# Altium PCB updated_pcb_file.PcbDoc (part 4 of 5)
Units mil, origin at the board's own origin, x right, y up, seen from the top; angles counter-clockwise.
Board outline 3385.83 x 2125.98 mil, 4 copper layers (L1 (TOP), L2 (GND), L3 (PWR), L4 (BOTTOM)), stack 38.228 mil thick; 154 components, 143 nets, 726 pads, 326 vias.
Unrouted connection lines stored in the file: 46.
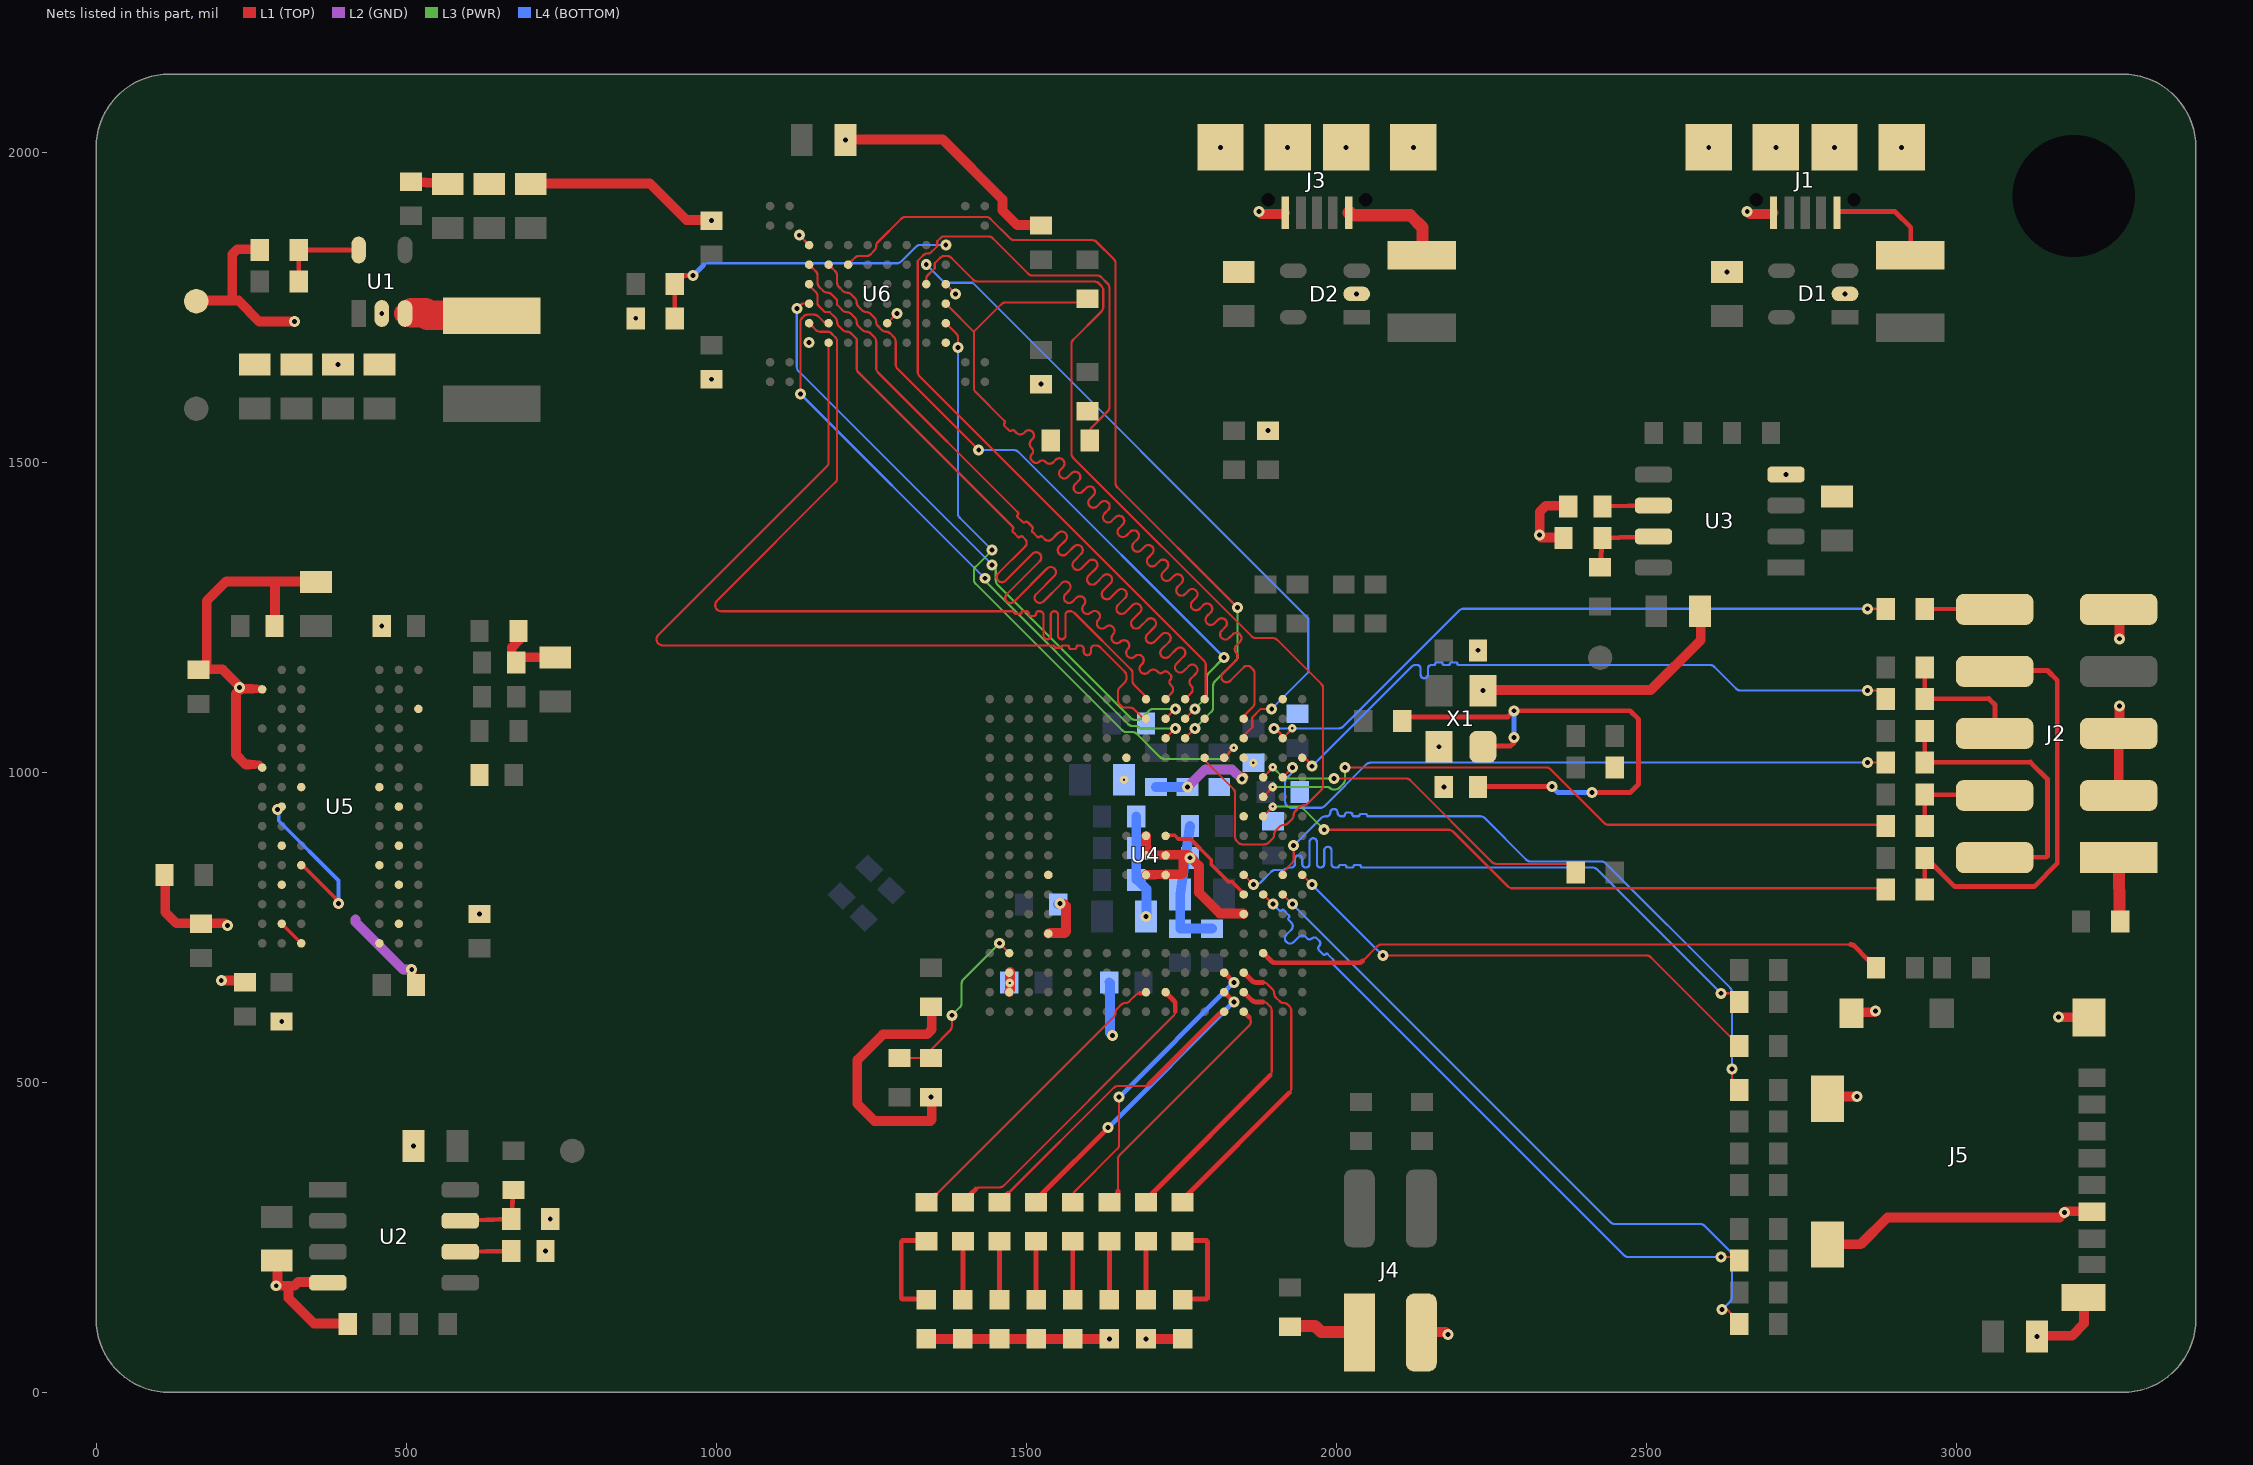
[diagram p6: the nets of this part, all layers, seen from the top]

## Via types
v1: diameter 17.72, hole 7.87, L1 (TOP) to L4 (BOTTOM), 310 vias
v2: diameter 13.78, hole 3.94, L1 (TOP) to L3 (PWR), 7 vias
v3: diameter 17.72, hole 7.87, L1 (TOP) to L3 (PWR), 5 vias
v4: diameter 13.78, hole 3.94, L2 (GND) to L4 (BOTTOM), 3 vias
v5: diameter 13.78, hole 3.94, L3 (PWR) to L4 (BOTTOM), 1 vias

## Nets (pads, with @x,y where several pads share a name; then routed paths per layer and width w, separated by ;. In a path a pad name is that pad's centre, name@x,y a point inside that pad or via, vN(x,y) a via of type N, cw(c..) or ccw(c..) an arc to the next point about the centre after c; other vN are vias at no path point) (continued)
FLASH_CLE: U4.M14 U6.D5 | length 1687
  L1 (TOP) w3.54: U6.D5@1338.58,1787.4 1338.58,1793.31 1338.58,1796.26 cw(c1345.71,1796.26) 1340.67,1801.3 1352.36,1812.99 1352.36,1820.87 1361.29,1829.79 cw(c1368.25,1822.83) 1368.25,1832.68 1371.91,1832.68 cw(c1371.91,1822.83) 1378.87,1829.79 1414.44,1794.22 ; 1414.44,1794.22 ccw(c1421.4,1801.18) 1421.4,1791.34 1610.1,1791.34 cw(c1610.1,1781.5) 1617.06,1788.46 1621.13,1784.38 cw(c1614.17,1777.42) 1624.02,1777.42 1624.02,1750.14 cw(c1614.17,1750.14) 1621.13,1743.18 1575.72,1697.76 ccw(c1582.68,1690.8) 1572.83,1690.8 1572.83,1513.92 ccw(c1582.68,1513.92) 1575.72,1506.96 1863.26,1219.42 ccw(c1870.22,1226.38) 1870.22,1216.54 1897.5,1216.54 cw(c1897.5,1206.69) 1904.46,1213.65 1975.46,1142.65 cw(c1968.5,1135.69) 1978.35,1135.69 1978.35,978.49 cw(c1968.5,978.49) 1975.46,971.53 1953.57,949.63 cw(c1946.85,956.35) 1946.85,946.85 ccw(c1946.85,937.35) 1940.13,944.07 1933.89,937.82 ccw(c1940.61,931.1) 1931.1,931.1 cw(c1921.6,931.1) 1928.32,924.38 1922.07,918.14 cw(c1915.35,924.86) 1915.35,915.35 ccw(c1915.35,905.85) 1908.63,912.57 1902.39,906.33 ccw(c1909.11,899.61) 1899.61,899.61 cw(c1890.1,899.61) 1896.82,892.89 1890.68,886.74 cw(c1883.72,893.7) 1883.72,883.86 1848.56,883.86 cw(c1848.56,893.7) 1841.6,886.74 1839.5,888.85 cw(c1846.46,895.81) 1836.61,895.81 1836.61,966.4 ccw(c1826.77,966.4) 1833.73,973.36 1791.01,1016.07 cw(c1797.97,1023.03) 1788.63,1019.92 U4.M14@1787.4,1023.62
FLASH_CS: R25.1 U4.P16 U6.C6 | length 1671
  L1 (TOP) w3.54: U6.C6@1370.08,1755.91 1374.02,1751.97 1415.35,1710.63 ; R25.1@1598.43,1763.78 1584.35,1758.5 cw(c1580.89,1767.72) 1580.89,1757.87 1466.67,1757.87 ccw(c1466.67,1748.03) 1459.71,1754.99 1415.35,1710.63 ; 1826.77,1216.54 cw(c1820.87,1222.44) 1814.96,1216.54 cw(c1820.87,1222.44) 1814.96,1228.35 1820.87,1234.25 ccw(c1814.96,1240.16) 1820.87,1246.06 ccw(c1814.96,1240.16) 1809.05,1246.06 1803.15,1240.16 cw(c1797.24,1246.06) 1791.34,1240.16 cw(c1797.24,1246.06) 1791.34,1251.97 1797.24,1257.87 ccw(c1791.34,1263.78) 1797.24,1269.68 ccw(c1791.34,1263.78) 1785.43,1269.68 1779.53,1263.78 cw(c1773.62,1269.68) 1767.72,1263.78 cw(c1773.62,1269.68) 1767.72,1275.59 1773.62,1281.5 ccw(c1767.72,1287.4) 1773.62,1293.31 ccw(c1767.72,1287.4) 1761.81,1293.31 1755.9,1287.4 cw(c1750,1293.31) 1744.09,1287.4 cw(c1750,1293.31) 1744.09,1299.21 1750,1305.12 ccw(c1744.09,1311.02) 1750,1316.93 ccw(c1744.09,1311.02) 1738.19,1316.93 1732.28,1311.02 cw(c1726.38,1316.93) 1720.47,1311.02 cw(c1726.38,1316.93) 1720.47,1322.83 1726.38,1328.74 ccw(c1720.47,1334.65) 1726.38,1340.55 ccw(c1720.47,1334.65) 1714.57,1340.55 1708.66,1334.65 cw(c1702.76,1340.55) 1696.85,1334.65 cw(c1702.76,1340.55) 1696.85,1346.46 1702.76,1352.36 ccw(c1696.85,1358.27) 1702.76,1364.17 ccw(c1696.85,1358.27) 1690.94,1364.17 1685.04,1358.27 cw(c1679.13,1364.17) 1673.23,1358.27 cw(c1679.13,1364.17) 1673.23,1370.08 1679.13,1375.98 ccw(c1673.23,1381.89) 1679.13,1387.8 ccw(c1673.23,1381.89) 1667.32,1387.8 1661.42,1381.89 cw(c1655.51,1387.79) 1649.61,1381.89 cw(c1655.51,1387.79) 1649.61,1393.7 1655.51,1399.61 ccw(c1649.61,1405.51) 1655.51,1411.42 ccw(c1649.61,1405.51) 1643.7,1411.42 1637.79,1405.51 cw(c1631.89,1411.42) 1625.98,1405.51 cw(c1631.89,1411.42) 1625.98,1417.32 1631.89,1423.23 ccw(c1625.98,1429.13) 1631.89,1435.04 ccw(c1625.98,1429.13) 1620.08,1435.04 1614.17,1429.13 cw(c1608.27,1435.04) 1602.36,1429.13 cw(c1608.27,1435.04) 1602.36,1440.94 1608.27,1446.85 ccw(c1602.36,1452.76) 1608.27,1458.66 ccw(c1602.36,1452.76) 1596.46,1458.66 1590.55,1452.76 cw(c1584.65,1458.66) 1578.74,1452.76 cw(c1584.65,1458.66) 1578.74,1464.57 1584.65,1470.47 ccw(c1578.74,1476.38) 1584.65,1482.28 ccw(c1578.74,1476.38) 1572.83,1482.28 1566.93,1476.38 cw(c1561.02,1482.28) 1555.12,1476.38 cw(c1561.02,1482.28) 1555.12,1488.19 1559.05,1492.13 ccw(c1553.15,1498.03) 1559.05,1503.94 ccw(c1553.15,1498.03) 1547.24,1503.94 1543.31,1500 cw(c1537.4,1505.91) 1531.5,1500 1530.51,1500.98 ccw(c1525.59,1496.06) 1520.67,1500.98 cw(c1515.75,1505.91) 1510.83,1500.98 1508.86,1502.95 cw(c1513.78,1507.87) 1508.86,1512.8 ccw(c1503.94,1517.72) 1508.86,1522.64 1507.87,1523.62 cw(c1513.78,1529.53) 1507.87,1535.43 1509.84,1537.4 ccw(c1503.94,1543.31) 1509.84,1549.21 ccw(c1503.94,1543.31) 1498.03,1549.21 1496.06,1547.24 cw(c1490.16,1553.15) 1484.25,1547.24 1480.31,1551.18 ccw(c1478.35,1549.21) 1476.38,1551.18 cw(c1474.41,1553.15) 1472.44,1551.18 1464.57,1559.05 cw(c1466.53,1561.02) 1464.57,1562.99 ccw(c1462.6,1564.96) 1464.57,1566.93 1418.24,1613.26 cw(c1425.2,1620.22) 1415.35,1620.22 1415.35,1710.63 ; 1826.77,1216.54 1832.68,1222.44 cw(c1838.58,1216.54) 1844.49,1222.44 cw(c1838.58,1216.54) 1844.49,1210.63 1838.58,1204.72 ccw(c1844.49,1198.82) 1838.58,1192.91 cw(c1832.68,1187.01) 1838.58,1181.1 1816.93,1159.45 ccw(c1822.83,1153.54) 1816.93,1147.64 ccw(c1822.83,1153.54) 1828.74,1147.64 1850.39,1169.29 cw(c1856.3,1163.39) 1862.2,1169.29 1865.23,1166.27 cw(c1858.27,1159.31) 1868.11,1159.31 1868.11,1112.34 cw(c1858.27,1112.34) 1865.23,1105.38 1854,1094.16 ccw(c1860.97,1087.2) 1851.63,1090.31 U4.P16@1850.39,1086.61
FLASH_D0: U4.L15 U6.H4 | length 1377.7
  L1 (TOP) w3.54: U6.H4@1212.6,1818.9 1216.53,1822.83 1223.49,1829.79 cw(c1230.45,1822.83) 1230.45,1832.68 1241.99,1832.68 ccw(c1241.99,1842.52) 1248.95,1835.56 1255.09,1841.7 ccw(c1248.37,1848.42) 1257.87,1848.42 cw(c1267.38,1848.42) 1260.66,1855.15 1298.3,1892.79 cw(c1305.26,1885.83) 1305.26,1895.67 1434.9,1895.67 cw(c1434.9,1885.83) 1441.86,1892.79 1473.49,1861.15 ccw(c1480.45,1868.11) 1480.45,1858.27 1606.16,1858.27 cw(c1606.16,1848.42) 1613.12,1855.38 1640.82,1827.69 cw(c1633.86,1820.73) 1643.7,1820.73 1643.7,1466.68 ccw(c1653.54,1466.68) 1646.58,1459.72 v1(1840.55,1265.75) ; U4.L15@1755.9,1055.12 v1(1771.65,1070.87)
  L3 (PWR) w3.54: v1(1771.65,1070.87) 1798.3,1097.51 ccw(c1791.34,1104.47) 1801.18,1104.47 1801.18,1139.62 cw(c1811.02,1139.62) 1804.06,1146.58 1837.67,1180.19 ccw(c1830.71,1187.15) 1840.55,1187.15 v1(1840.55,1265.75)
FLASH_D1: U4.L16 U6.J4 | length 1065.1
  L1 (TOP) w3.54: U6.J4@1181.1,1818.9 1185.04,1814.96 1192,1808 cw(c1185.04,1801.04) 1194.88,1801.04 1194.88,1789.51 ccw(c1204.72,1789.51) 1197.76,1782.55 1203.91,1776.41 ccw(c1210.63,1783.13) 1210.63,1773.62 cw(c1210.63,1764.12) 1217.35,1770.84 1223.59,1764.59 cw(c1216.87,1757.87) 1226.38,1757.87 ccw(c1235.88,1757.87) 1229.16,1751.15 1235.4,1744.91 ccw(c1242.13,1751.63) 1242.13,1742.13 cw(c1242.13,1732.62) 1248.85,1739.34 1255.09,1733.1 cw(c1248.37,1726.38) 1257.87,1726.38 ccw(c1267.38,1726.38) 1260.66,1719.66 1266.9,1713.41 ccw(c1273.62,1720.13) 1273.62,1710.63 cw(c1273.62,1701.12) 1280.34,1707.85 1286.49,1701.7 cw(c1279.53,1694.74) 1289.37,1694.74 1289.37,1657.62 ccw(c1299.21,1657.62) 1292.25,1650.66 v1(1423.23,1519.68) ; U4.L16@1755.9,1086.61 v1(1771.65,1102.36)
  L3 (PWR) w3.54: v1(1771.65,1102.36) 1788.46,1119.16 ccw(c1781.5,1126.12) 1791.34,1126.12 1791.34,1153.4 cw(c1801.18,1153.4) 1794.22,1160.36 v1(1818.9,1185.04)
  L4 (BOTTOM) w3.54: v1(1423.23,1519.68) 1480.17,1519.68 cw(c1480.17,1509.84) 1487.13,1516.8 v1(1818.9,1185.04)
FLASH_D2: U4.L17 U6.K4 | length 1491
  L1 (TOP) w3.54: U6.K4@1149.61,1818.9 1153.54,1814.96 1160.5,1808 cw(c1153.54,1801.04) 1163.39,1801.04 1163.39,1789.51 ccw(c1173.23,1789.51) 1166.27,1782.55 1172.41,1776.41 ccw(c1179.13,1783.13) 1179.13,1773.62 cw(c1179.13,1764.12) 1185.85,1770.84 1194.88,1761.81 1194.88,1753.94 1203.91,1744.91 ccw(c1210.63,1751.63) 1210.63,1742.13 cw(c1210.63,1732.62) 1217.35,1739.34 1223.59,1733.1 cw(c1216.87,1726.38) 1226.38,1726.38 ccw(c1235.88,1726.38) 1229.16,1719.66 1235.4,1713.41 ccw(c1242.13,1720.13) 1242.13,1710.63 cw(c1242.13,1701.12) 1248.85,1707.85 1254.99,1701.7 cw(c1248.03,1694.74) 1257.87,1694.74 1257.87,1651.71 ccw(c1267.72,1651.71) 1260.76,1644.75 1486.22,1419.29 cw(c1484.25,1417.32) 1486.22,1415.35 ccw(c1488.19,1413.39) 1486.22,1411.42 1494.09,1403.54 ccw(c1496.06,1405.51) 1498.03,1403.54 cw(c1500,1401.57) 1501.97,1403.54 1509.84,1395.67 cw(c1507.87,1393.7) 1509.84,1391.73 ccw(c1511.81,1389.76) 1509.84,1387.79 1517.72,1379.92 ccw(c1519.68,1381.89) 1521.65,1379.92 cw(c1523.62,1377.95) 1525.59,1379.92 1529.53,1375.98 ccw(c1535.43,1381.89) 1541.34,1375.98 1551.18,1385.83 cw(c1557.09,1379.92) 1562.99,1385.83 cw(c1557.09,1379.92) 1562.99,1374.02 1553.15,1364.17 ccw(c1559.05,1358.27) 1553.15,1352.36 ccw(c1559.05,1358.27) 1564.96,1352.36 1576.77,1364.17 ; 1576.77,1340.55 ccw(c1582.68,1334.65) 1576.77,1328.74 ccw(c1582.68,1334.65) 1588.58,1328.74 1600.39,1340.55 cw(c1606.3,1334.65) 1612.2,1340.55 cw(c1606.3,1334.65) 1612.2,1328.74 1600.39,1316.93 ccw(c1606.3,1311.02) 1600.39,1305.12 ccw(c1606.3,1311.02) 1612.2,1305.12 1624.02,1316.93 cw(c1629.92,1311.02) 1635.83,1316.93 cw(c1629.92,1311.02) 1635.83,1305.12 1624.02,1293.31 ccw(c1629.92,1287.4) 1624.02,1281.5 ccw(c1629.92,1287.4) 1635.83,1281.5 1647.64,1293.31 cw(c1653.54,1287.4) 1659.45,1293.31 cw(c1653.54,1287.4) 1659.45,1281.5 1647.64,1269.68 ccw(c1653.54,1263.78) 1647.64,1257.87 ccw(c1653.54,1263.78) 1659.45,1257.87 1671.26,1269.68 cw(c1677.16,1263.78) 1683.07,1269.68 cw(c1677.16,1263.78) 1683.07,1257.87 1671.26,1246.06 ccw(c1677.16,1240.16) 1671.26,1234.25 ccw(c1677.16,1240.16) 1683.07,1234.25 1694.88,1246.06 cw(c1700.79,1240.16) 1706.69,1246.06 cw(c1700.79,1240.16) 1706.69,1234.25 1694.88,1222.44 ccw(c1700.79,1216.54) 1694.88,1210.63 ccw(c1700.79,1216.54) 1706.69,1210.63 1718.5,1222.44 cw(c1724.41,1216.54) 1730.31,1222.44 cw(c1724.41,1216.54) 1730.31,1210.63 1718.5,1198.82 ccw(c1724.41,1192.91) 1718.5,1187.01 ccw(c1724.41,1192.91) 1730.31,1187.01 1742.13,1198.82 cw(c1748.03,1192.91) 1753.94,1198.82 cw(c1748.03,1192.91) 1753.94,1187.01 1742.13,1175.2 ccw(c1748.03,1169.29) 1742.13,1163.39 ccw(c1748.03,1169.29) 1753.94,1163.39 1761.81,1171.26 cw(c1767.72,1165.35) 1773.62,1171.26 cw(c1767.72,1165.35) 1773.62,1159.45 1765.75,1151.57 ccw(c1771.65,1145.67) 1765.75,1139.76 cw(c1759.84,1133.86) 1765.75,1127.95 U4.L17@1755.9,1118.11 ; 1576.77,1364.17 cw(c1582.68,1358.27) 1588.58,1364.17 cw(c1582.68,1358.27) 1588.58,1352.36 1576.77,1340.55
FLASH_D3: U4.K17 U6.K5 | length 1492.3
  L1 (TOP) w3.54: U6.K5@1149.61,1787.4 1150.86,1784.89 ccw(c1159.66,1789.29) 1152.7,1782.33 1160.5,1774.54 cw(c1153.54,1767.58) 1163.39,1767.58 1163.39,1755.98 ccw(c1168.31,1755.98) 1164.83,1752.5 1175.2,1742.13 1183.07,1742.13 1192.1,1733.1 cw(c1185.38,1726.38) 1194.88,1726.38 ccw(c1204.39,1726.38) 1197.67,1719.66 1203.91,1713.41 ccw(c1210.63,1720.13) 1210.63,1710.63 cw(c1210.63,1701.12) 1217.35,1707.85 1226.38,1698.82 1226.38,1651.71 ccw(c1236.22,1651.71) 1229.26,1644.75 1478.35,1395.67 cw(c1476.38,1393.7) 1478.35,1391.73 ccw(c1480.31,1389.76) 1478.35,1387.79 1486.22,1379.92 ccw(c1488.19,1381.89) 1490.16,1379.92 cw(c1492.13,1377.95) 1494.09,1379.92 1498.03,1375.98 cw(c1492.13,1370.08) 1498.03,1364.17 1454.72,1320.87 ccw(c1460.63,1314.96) 1454.72,1309.05 ccw(c1460.63,1314.96) 1466.53,1309.05 1509.84,1352.36 cw(c1515.75,1346.46) 1521.65,1352.36 cw(c1515.75,1346.46) 1521.65,1340.55 1468.5,1287.4 ccw(c1474.41,1281.5) 1468.5,1275.59 ccw(c1474.41,1281.5) 1480.31,1275.59 1533.46,1328.74 cw(c1539.37,1322.83) 1545.28,1328.74 cw(c1539.37,1322.83) 1545.28,1316.93 1515.75,1287.4 ccw(c1521.65,1281.5) 1515.75,1275.59 ccw(c1521.65,1281.5) 1527.56,1275.59 1557.09,1305.12 cw(c1562.99,1299.21) 1568.9,1305.12 cw(c1562.99,1299.21) 1568.9,1293.31 1562.99,1287.4 ccw(c1568.9,1281.5) 1562.99,1275.59 ccw(c1568.9,1281.5) 1574.8,1275.59 1580.71,1281.5 cw(c1586.61,1275.59) 1592.52,1281.5 cw(c1586.61,1275.59) 1592.52,1269.68 ccw(c1598.42,1263.78) 1592.52,1257.87 ccw(c1598.42,1263.78) 1604.33,1257.87 cw(c1610.24,1251.97) 1616.14,1257.87 cw(c1610.24,1251.97) 1616.14,1246.06 ccw(c1622.05,1240.16) 1616.14,1234.25 ccw(c1622.05,1240.16) 1627.95,1234.25 cw(c1633.86,1228.35) 1639.76,1234.25 cw(c1633.86,1228.35) 1639.76,1222.44 ccw(c1645.67,1216.54) 1639.76,1210.63 ccw(c1645.67,1216.54) 1651.57,1210.63 cw(c1657.48,1204.72) 1663.39,1210.63 cw(c1657.48,1204.72) 1663.39,1198.82 ccw(c1669.29,1192.91) 1663.39,1187.01 ccw(c1669.29,1192.91) 1675.2,1187.01 cw(c1681.1,1181.1) 1687.01,1187.01 cw(c1681.1,1181.1) 1687.01,1175.2 1685.04,1173.23 ccw(c1690.94,1167.32) 1685.04,1161.42 ccw(c1690.94,1167.32) 1696.85,1161.42 1698.82,1163.39 cw(c1704.72,1157.48) 1710.63,1163.39 1712.6,1161.42 ccw(c1716.53,1165.35) 1720.47,1161.42 cw(c1724.41,1157.48) 1728.35,1161.42 1732.28,1157.48 cw(c1728.35,1153.54) 1732.28,1149.61 ccw(c1736.22,1145.67) 1732.28,1141.73 1734.25,1139.76 cw(c1728.35,1133.86) 1734.25,1127.95 U4.K17@1724.41,1118.11
FLASH_D4: U4.K16 U6.K6 | length 1006.2
  L1 (TOP) w3.54: v1(1129.92,1748.03) 1135.71,1753.82 cw(c1140.75,1748.78) 1140.75,1755.91 1143.7,1755.91 U6.K6@1149.61,1755.91 ; U4.K16@1724.41,1086.61 v1(1740.16,1102.36)
  L3 (PWR) w3.54: v1(1444.88,1334.65) 1447.9,1331.62 cw(c1440.94,1324.66) 1450.79,1324.66 1450.79,1309.19 ccw(c1460.63,1309.19) 1453.67,1302.24 1668.38,1087.53 ccw(c1675.34,1094.49) 1675.34,1084.65 1678.99,1084.65 ccw(c1678.99,1094.49) 1685.95,1087.53 1697.9,1099.48 cw(c1704.86,1092.52) 1704.86,1102.36 v1(1740.16,1102.36)
  L4 (BOTTOM) w3.54: v1(1129.92,1748.03) 1129.92,1653.68 ccw(c1139.76,1653.68) 1132.8,1646.72 v1(1444.88,1334.65)
FLASH_D5: U4.K15 U6.J7 | length 1023.9
  L1 (TOP) w3.54: v1(1135.83,1610.24) 1135.83,1726.24 cw(c1145.67,1726.24) 1138.71,1733.2 1140.82,1735.31 cw(c1147.78,1728.35) 1147.78,1738.19 1157.34,1738.19 cw(c1157.34,1728.35) 1164.3,1735.31 1173.11,1726.5 ccw(c1178.15,1731.54) 1178.15,1724.41 U6.J7@1181.1,1724.41 ; U4.K15@1724.41,1055.12 v1(1740.16,1070.87)
  L3 (PWR) w3.54: v1(1433.07,1312.99) 1433.07,1311.02 ccw(c1437.82,1311.02) 1434.46,1307.66 1664.44,1077.69 ccw(c1671.4,1084.65) 1671.4,1074.8 1676.35,1074.8 cw(c1676.35,1068.08) 1681.1,1072.83 ccw(c1685.85,1077.59) 1685.85,1070.87 v1(1740.16,1070.87)
  L4 (BOTTOM) w3.54: v1(1135.83,1610.24) v1(1433.07,1312.99)
FLASH_D6: U4.J17 U6.K7 | length 1509.7
  L1 (TOP) w3.54: U6.K7@1149.61,1724.41 1153.54,1720.47 1160.5,1713.51 ccw(c1167.46,1720.47) 1167.46,1710.63 1178.99,1710.63 cw(c1178.99,1700.79) 1185.95,1707.75 1192,1701.7 cw(c1185.04,1694.74) 1194.88,1694.74 1194.88,1474.55 cw(c1185.04,1474.55) 1192,1467.59 1001.05,1276.64 ccw(c1008.01,1269.68) 1008.01,1259.84 1478.35,1259.84 cw(c1478.35,1257.87) 1480.31,1257.87 ccw(c1482.28,1257.87) 1482.28,1255.91 1490.16,1255.91 ccw(c1490.16,1257.87) 1492.13,1257.87 cw(c1494.09,1257.87) 1494.09,1259.84 1500,1259.84 cw(c1500,1255.91) 1503.94,1255.91 ccw(c1507.87,1255.91) 1507.87,1251.97 1511.81,1251.97 ccw(c1511.81,1255.91) 1515.75,1255.91 cw(c1519.68,1255.91) 1519.68,1259.84 1521.65,1259.84 cw(c1521.65,1253.94) 1527.56,1253.94 1527.56,1220.47 ccw(c1533.46,1220.47) 1533.46,1214.57 ccw(c1533.46,1220.47) 1539.37,1220.47 1539.37,1253.94 cw(c1545.27,1253.94) 1545.27,1259.84 cw(c1545.27,1253.94) 1551.18,1253.94 1551.18,1220.47 ccw(c1557.09,1220.47) 1557.09,1214.57 ccw(c1557.09,1220.47) 1562.99,1220.47 1562.99,1253.94 cw(c1568.9,1253.94) 1568.9,1259.84 1570.73,1259.84 cw(c1570.73,1250) 1577.69,1256.96 1668.38,1166.27 cw(c1661.42,1159.31) 1671.26,1159.31 1671.26,1147.78 ccw(c1681.1,1147.78) 1674.14,1140.82 1689.3,1125.66 cw(c1682.34,1118.7) 1691.68,1121.81 U4.J17@1692.91,1118.11
FLASH_D7: U4.J16 U6.J8 | length 1512.4
  L1 (TOP) w3.54: U6.J8@1181.1,1692.91 1181.1,1687.01 1181.1,1500.14 cw(c1171.26,1500.14) 1178.22,1493.18 906.57,1221.53 ccw(c913.53,1214.57) 913.53,1204.72 1543.31,1204.72 cw(c1543.31,1202.76) 1545.27,1202.76 ccw(c1547.24,1202.76) 1547.24,1200.79 1555.12,1200.79 ccw(c1555.12,1202.76) 1557.09,1202.76 cw(c1559.05,1202.76) 1559.05,1204.72 1565.94,1204.72 cw(c1565.94,1201.77) 1568.9,1201.77 ccw(c1571.85,1201.77) 1571.85,1198.82 1577.76,1198.82 ccw(c1577.76,1201.77) 1580.71,1201.77 cw(c1583.66,1201.77) 1583.66,1204.72 1586.61,1204.72 cw(c1586.61,1198.82) 1592.52,1198.82 1592.52,1194.88 ccw(c1598.42,1194.88) 1598.42,1188.98 ccw(c1598.42,1194.88) 1604.33,1194.88 1604.33,1198.82 cw(c1610.24,1198.82) 1610.24,1204.72 1612.06,1204.72 cw(c1612.06,1194.88) 1619.02,1201.84 1658.53,1162.33 cw(c1651.57,1155.37) 1661.42,1155.37 1661.42,1151.71 cw(c1651.57,1151.71) 1658.53,1144.75 1650.52,1136.74 ccw(c1657.48,1129.78) 1647.64,1129.78 1647.64,1116.28 ccw(c1657.48,1116.28) 1650.52,1109.32 1652.63,1107.21 ccw(c1659.59,1114.17) 1659.59,1104.33 1667.18,1104.33 cw(c1667.18,1094.49) 1674.14,1101.45 1685.36,1090.23 ccw(c1692.32,1097.19) 1689.21,1087.85 U4.J16@1692.91,1086.61
FLASH_OE: U4.P15 U6.D4 | length 1098.6
  L1 (TOP) w3.54: U4.P15@1850.39,1055.12 1852.36,1061.02 1864.17,1072.83 1864.17,1088.58 1877.95,1102.36 v1(1895.67,1102.36)
  L4 (BOTTOM) w3.54: v1(1338.58,1818.9) 1368.11,1789.37 1413.39,1789.37 1954.72,1248.03 1954.72,1161.42 v1(1895.67,1102.36)
FLASH_R_RDY: R28.2 U6.C8
FLASH_RDY: R26.1 R28.1 U4.M17 | length 1544.6
  L1 (TOP) w3.54: R26.1@1598.43,1582.68 1614.17,1568.9 1616.14,1566.93 ; R28.1@1602.36,1535.43 1602.36,1549.07 cw(c1612.2,1549.07) 1605.24,1556.03 1630.97,1581.76 ccw(c1624.02,1588.72) 1633.86,1588.72 1633.86,1781.36 ccw(c1624.02,1781.36) 1630.97,1788.32 1620.99,1798.3 ccw(c1614.03,1791.34) 1614.03,1801.18 1509.98,1801.18 cw(c1509.98,1811.02) 1503.02,1804.06 1445.8,1861.29 ccw(c1438.84,1854.33) 1438.84,1864.17 1364.17,1864.17 1356.3,1856.3 1356.3,1848.42 1347.27,1839.4 cw(c1340.55,1846.12) 1340.55,1836.61 ccw(c1340.55,1827.11) 1333.83,1833.83 1324.8,1824.8 1324.8,1645.81 ccw(c1334.65,1645.81) 1327.69,1638.85 1786.49,1180.05 cw(c1779.53,1173.09) 1789.37,1173.09 1789.37,1125.61 cw(c1779.53,1125.61) 1788.86,1122.5 U4.M17@1787.4,1118.11
FLASH_WE: U4.N14 U6.C7 | length 1024.3
  L1 (TOP) w3.54: U6.C7@1370.08,1724.41 1374.02,1720.47 1386.88,1707.61 cw(c1379.92,1700.65) 1389.76,1700.65 v1(1389.76,1685.04) ; U4.N14@1818.9,1023.62 v2(1834.65,1039.37)
  L3 (PWR) w3.54: v1(1444.88,1358.27) 1418.24,1331.62 ccw(c1425.2,1324.66) 1415.35,1324.66 1415.35,1311.16 ccw(c1425.2,1311.16) 1418.24,1304.2 1654.6,1067.84 ccw(c1661.56,1074.8) 1661.56,1064.96 1671.12,1064.96 cw(c1671.12,1055.12) 1678.08,1062.08 1715.62,1024.54 ccw(c1722.58,1031.5) 1722.58,1021.65 1812.85,1021.65 ccw(c1812.85,1031.5) 1819.81,1024.54 v2(1834.65,1039.37)
  L4 (BOTTOM) w3.54: v1(1389.76,1685.04) 1389.76,1417.46 ccw(c1399.61,1417.46) 1392.65,1410.5 v1(1444.88,1358.27)
FLASH_WP: R27.1 R29.2 U6.C3 | length 516.5
  L1 (TOP) w7.87: R29.2@933.07,1732.28 933.07,1748.03 933.07,1771.65 933.07,1787.4 943.97,1798.3 cw(c950.93,1791.34) 950.93,1801.18 v1(962.6,1801.18)
  L4 (BOTTOM) w3.54: 979.4,1817.98 cw(c986.36,1811.02) 986.36,1820.87 1291.2,1820.87 ccw(c1291.2,1830.71) 1298.16,1823.75 1321.92,1847.51 cw(c1328.88,1840.55) 1328.88,1850.39 v1(1370.08,1850.39)
  L4 (BOTTOM) w7.87: v1(962.6,1801.18) 979.4,1817.98
GND: C1.1 C2.1 C3.1 C4.1 C5.1 C6.1 C7.1 C8.1 C9.1 C10.1 C11.1 C12.1 C13.1 C14.1 C15.1 C16.1 C17.1 C18.1 C19.1 C20.1 C21.1 C22.1 C23.1 C24.1 C25.1 C26.1 C27.1 C28.1 C29.1 C30.1 C31.1 C32.1 C33.1 C34.1 C35.1 C36.1 C37.1 C38.1 C39.1 C40.1 C41.1 C42.1 C43.1 C44.1 C45.1 C46.1 C47.1 C49.1 C50.1 C51.1 C52.1 C53.1 C54.1 C55.1 C56.1 C57.1 C58.1 D1.2 D2.2 D3.1 D4.1 D5.1 D6.1 D7.1 D8.1 D9.1 D10.1 J1.5 J1.SH J2.3 J2.5 J2.9 J3.5 J3.SH J4.3 J5.6 J5.10 J5.MP R4.1 R5.1 R8.1 R11.1 R14.1 R15.1 R18.1 R19.1 R20.1 R24.1 R29.1 TP4.1 U1.2 U2.4 U3.4 U4.B2 U4.B3 U4.D5 U4.D8 U4.H14 U4.J8 U4.J9 U4.J10 U4.K8 U4.K9 U4.K10 U4.M16 U4.P6 U4.P7 U4.P11 U4.P13 U4.P14 U4.T17 U5.A3 U5.A7 U5.B2 U5.B8 U5.D2 U5.D8 U5.E3 U5.E7 U5.F2 U5.F8 U5.H2 U5.H8 U5.J3 U5.J7 U5.K9 U5.N1 U5.P9 U6.C5 U6.F7 U6.K3 U6.K8 X1.2 X1.4 | length 6500.2
  L1 (TOP) w3.54: v1(1133.86,1866.14) U6.K3@1149.61,1850.39 ; U6.F7@1275.59,1724.41 v1(1291.34,1740.16) ; U6.C5@1370.08,1787.4 v1(1385.83,1771.65)
  L1 (TOP) w5.91: v1(292.37,939.82) 298.27,945.72 U5.H8@299.21,944.88 ; U5.B8@299.21,755.91 U5.A7@330.71,724.41 ; U5.E7@330.71,850.39 333.7,849.27 390.79,792.18 v1(390.79,788.24) ; U4.K10@1724.41,897.64 1725.44,898.48 1739.22,898.48 1745.12,892.57 1764.81,892.57 1798.27,859.11 1798.27,851.24 1825.83,823.68 1831.74,823.68 1849.45,805.96 U4.P7@1850.39,803.15
  L1 (TOP) w11.81: 262.84,1012.65 U5.K9@267.72,1007.87 ; U5.P9@264.81,1134.7 U5.P9@267.72,1133.86
  L1 (TOP) w12.2: 260.87,1012.65 262.84,1012.65 ; U5.P9@262.84,1134.7 U5.P9@264.81,1134.7
  L1 (TOP) w12.6: 258.9,1012.65 260.87,1012.65 ; 260.87,1134.7 U5.P9@262.84,1134.7
  L1 (TOP) w12.99: 256.93,1012.65 258.9,1012.65 ; 258.9,1134.7 260.87,1134.7
  L1 (TOP) w13.39: 254.96,1012.65 256.93,1012.65 ; 256.93,1134.7 258.9,1134.7
  L1 (TOP) w13.78: 253,1012.65 254.96,1012.65 ; 254.96,1134.7 256.93,1134.7 ; U4.B3@1472.44,677.17 U4.B3@1473.47,678.01 ; U4.J9@1692.91,866.14 U4.J9@1693.94,866.98 ; U4.K8@1724.41,834.65 U4.K8@1725.44,835.49 ; U4.K9@1724.41,866.14 U4.K9@1725.44,866.98
  L1 (TOP) w14.17: 251.03,1012.65 253,1012.65 ; 253,1134.7 254.96,1134.7
  L1 (TOP) w14.57: 249.06,1012.65 251.03,1012.65 ; 251.03,1134.7 253,1134.7
  L1 (TOP) w14.96: 247.09,1012.65 249.06,1012.65 ; 249.06,1134.7 251.03,1134.7
  L1 (TOP) w15.35: 245.12,1012.65 247.09,1012.65 ; 247.09,1134.7 249.06,1134.7
  L1 (TOP) w15.75: R19.1@110.24,834.65 111.26,833.52 111.26,774.46 128.98,756.75 170.32,756.75 169.29,755.91 172.29,756.75 207.72,756.75 v1(211.66,752.81) ; TP4.1@161.42,1759.84 164.41,1760.69 229.37,1760.69 262.84,1727.22 v1(319.93,1727.22) ; C43.1@165.35,1165.35 C43.1@178.19,1166.2 ; v1(201.82,664.23) 239.22,664.23 C47.1@240.16,661.42 ; 219.53,1760.69 219.53,1835.49 227.41,1843.36 262.84,1843.36 R5.1@263.78,1842.52 ; 245.12,1012.65 241.19,1012.65 225.44,1028.4 225.44,1126.83 v1@233.31,1134.7 ; 247.09,1134.7 v1@233.31,1134.7 ; C42.1@287.4,1236.22 288.43,1239.03 288.43,1307.93 ; v1(290.4,172.1) v1@292.37,172.1 ; C9.1@291.34,212.6 292.37,211.47 v1@292.37,172.1 ; 310.08,172.1 310.08,152.42 351.42,111.08 404.57,111.08 C10.1@405.51,110.24 ; C39.1@354.33,1307.09 353.39,1307.93 288.43,1307.93 ; U2.4@373.54,176.97 373.07,178.01 325.83,178.01 319.93,172.1 v1@292.37,172.1 ; C4.1@507.87,1952.76 C3.1@566.93,1948.82 ; v1(508.9,681.94) 508.9,666.2 C45.1@515.75,657.48 ; R24.1@681.1,1228.35 682.13,1213.44 670.32,1201.63 670.32,1185.88 C49.1@740.16,1185.04 ; C1.1@700.79,1948.82 703.78,1949.66 892.76,1949.66 951.82,1890.61 993.15,1890.61 v1(992.13,1889.76) ; v1(1208.66,2019.69) 1209.69,2020.53 1365.2,2020.53 1461.66,1924.07 1461.66,1906.35 1485.28,1882.73 1522.68,1882.73 C54.1@1523.62,1881.89 ; D3.1@1338.58,86.42 1574.8,86.42 v1(1633.86,86.42) ; v1(1346.46,476.38) 1347.48,477.22 1347.48,439.82 1345.52,437.85 1254.96,437.85 1227.41,465.41 1227.41,536.28 1268.74,577.61 1339.61,577.61 1347.48,585.49 1347.48,620.92 R15.1@1346.46,622.05 ; U4.B2@1472.44,645.67 1473.47,648.48 U4.B3@1473.47,678.01 ; U4.D5@1535.43,740.16 1538.43,741 1562.05,741 1564.02,742.97 1564.02,784.31 1560.08,788.24 v1(1554.18,788.24) ; v1(1692.91,86.42) D10.1@1751.97,86.42 ; U4.J8@1692.91,834.65 U4.K8@1725.44,835.49 ; U4.J9@1692.91,866.14 U4.K9@1725.44,866.98 ; U4.J10@1692.91,897.64 U4.J9@1693.94,866.98 ; U4.K8@1724.41,834.65 1727.41,835.49 1751.03,835.49 1753,837.46 1753,866.98 ; U4.K9@1724.41,866.14 1727.41,866.98 1753,866.98 ; v1(1763.78,862.2) 1762.84,865.02 1760.87,866.98 1753,866.98 ; v1@1764.81,863.05 1778.59,849.27 1778.59,805.96 1812.05,772.5 1849.45,772.5 U4.P6@1850.39,771.65 ; v1(1847.48,989.03) U4.P13@1850.39,992.13 ; v1(1875.04,1904.39) 1878.98,1900.45 1914.41,1900.45 J3.5@1917.32,1902.56 ; J4.3@2136.81,96.85 2138.82,97.3 2176.22,97.3 v1(2180.16,93.36) ; v1(2236.22,1131.89) 2237.25,1132.73 2506.93,1132.73 2587.64,1213.44 2587.64,1258.72 C14.1@2586.61,1259.84 ; R8.1@2366.14,1377.95 2365.2,1378.8 2329.77,1378.8 2327.8,1380.76 2327.8,1420.13 2337.64,1429.98 2373.07,1429.98 C15.1@2374.02,1429.13 ; v1(2662.44,1904.39) 2666.38,1900.45 2701.82,1900.45 J1.5@2704.72,1902.56 ; J5.MP@2792.22,238.78 2845.52,239.03 2888.82,282.34 3166.38,282.34 3176.22,292.18 3217.56,292.18 J5.6@3218.41,291.34 ; J5.MP@2792.22,473.82 2794.33,477.22 v1(2839.61,477.22) ; J5.10@2830.61,611.61 2833.7,613.05 2867.17,613.05 v1(2869.14,615.02) ; v1(3129.92,90.55) 3130.95,91.39 3186.07,91.39 3205.75,111.08 3205.75,152.42 J5.MP@3204.63,153.35 ; v1(3164.41,605.17) 3211.66,605.17 J5.MP@3213.48,604.72 ; J2.3@3261.42,962.8 3261.42,1062.8 3262.84,1065.8 v1(3262.84,1107.14) ; J2.9@3261.42,1262.8 3262.84,1262.65 v1(3262.84,1215.41) ; C43.1@178.19,1166.2 203.78,1166.2 231.34,1138.64 v1(231.34,1136.67) v1@233.31,1134.7 ; C43.1@178.19,1166.2 178.19,1276.43 209.69,1307.93 288.43,1307.93
  L2 (GND) w15.75: 418.35,762.65 418.35,758.72 495.12,681.94 v1(508.9,681.94) ; v1@1760.87,977.22 1788.43,1004.78 1831.74,1004.78 v1(1847.48,989.03)
  L4 (BOTTOM) w5.91: v1(292.37,939.82) 294.33,937.85 294.33,922.1 390.79,825.65 v1(390.79,788.24)
  L4 (BOTTOM) w15.75: C17.1@1551.18,787.4 v1(1554.18,788.24) ; C18.1@1633.86,661.42 1634.89,660.29 1634.89,579.58 v1(1638.82,575.65) ; C23.1@1677.17,929.13 1677.17,826.77 1680.16,825.65 1693.94,811.87 1693.94,768.56 v1(1692.91,767.72) ; C27.1@1708.66,976.38 v1(1759.84,976.38) ; C30.1@1763.78,913.39 1748.03,803.15 1748.03,748.03 C31.1@1799.21,748.03
  other v1: 724.41,228.35 732.28,279.53 3174.26,290.21 511.81,397.64 299.21,598.43 618.11,771.65 2173.23,976.38 2165.35,1041.34 2228.35,1196.85 460.63,1236.22 2327.8,1382.73 2724.88,1480.51 1889.76,1551.18 1523.62,1625.98 992.13,1633.86 389.76,1657.48 1149.61,1692.91 870.08,1732.28 460.63,1740.16 2032.68,1771.65 2820.08,1771.65 2629.92,1807.09 1812.99,2007.87 1921.26,2007.87 2015.75,2007.87 2124.02,2007.87 2600.39,2007.87 2708.66,2007.87 2803.15,2007.87 2911.42,2007.87
  other v4: 1473.47,660.29 1657.48,988.19 1866.14,1015.75
JTAG_J_RSTn: J2.10 R41.1 | length 112.6
  L1 (TOP) w7.87: R41.1@2948.82,1263.78 J2.10@3061.42,1262.8
JTAG_J_TCK: J2.4 R33.1 R38.1 | length 163.8
  L1 (TOP) w7.87: R38.1@2948.82,913.39 2948.82,964.57 J2.4@3061.42,962.8
JTAG_J_TDI: J2.8 R35.1 R40.1 | length 702.5
  L1 (TOP) w7.87: R40.1@2948.82,811.02 2948.82,862.2 2951.82,861.08 2997.09,815.8 3125.04,815.8 3162.44,853.2 3162.44,1148.48 3146.7,1164.23 3064.02,1164.23 J2.8@3061.42,1162.8
JTAG_J_TDO: J2.6 R34.1 R39.1 | length 214.9
  L1 (TOP) w7.87: R34.1@2948.82,1169.29 2948.82,1118.11 3052.21,1118.95 3062.05,1109.11 3062.05,1065.8 J2.6@3061.42,1062.8
JTAG_J_TMS: J2.2 R32.1 R37.1 | length 470.6
  L1 (TOP) w7.87: R32.1@2948.82,1066.93 2948.82,1015.75 3119.14,1016.59 3146.7,989.03 3146.7,865.02 3144.73,863.05 3064.02,863.05 J2.2@3061.42,862.8
JTAG_TCK: R38.2 U4.R12 | length 1076.8
  L1 (TOP) w3.54: U4.R12@1881.89,960.63 v2(1897.64,976.38) ; v1(2013.78,1007.87) 2338.44,1007.87 cw(c2338.44,998.03) 2345.4,1004.99 2432.16,918.24 ccw(c2439.12,925.2) 2439.12,915.35 2872.05,915.35 R38.2@2885.83,913.39
  L3 (PWR) w3.54: v2(1897.64,976.38) 1985.4,976.38 cw(c1985.4,969.66) 1990.16,974.41 ccw(c1994.91,979.16) 1994.91,972.44 1997.89,972.44 ccw(c1997.89,982.28) 2004.85,975.32 2010.9,981.37 ccw(c2003.94,988.33) 2013.78,988.33 v1(2013.78,1007.87)
JTAG_TDI: R40.2 U4.R11 | length 1064
  L1 (TOP) w3.54: U4.R11@1881.89,929.13 v2(1897.64,944.88) ; v1(1980.31,907.48) 2180.96,907.48 cw(c2180.96,897.64) 2187.92,904.6 2276.64,815.87 ccw(c2283.6,822.83) 2283.6,812.99 2872.05,812.99 R40.2@2885.83,811.02
  L3 (PWR) w3.54: v2(1897.64,944.88) 1938.84,944.88 cw(c1938.84,935.04) 1945.8,942 v1(1980.31,907.48)
JTAG_TDO: R39.2 U4.U14 | length 1078.1
  L1 (TOP) w3.54: U4.U14@1944.88,1023.62 1948.58,1022.39 cw(c1945.47,1013.05) 1952.43,1020.01 1959.93,1012.51 cw(c1958.25,1010.83) 1960.63,1010.83 v1(1960.63,1009.84) ; v1(2856.3,1131.89) 2867.97,1131.89 cw(c2867.97,1122.05) 2874.93,1129.01 R39.2@2885.83,1118.11
  L4 (BOTTOM) w3.54: v1(1960.63,1009.84) 2121.13,1170.35 cw(c2128.09,1163.39) 2128.09,1173.23 2129.92,1173.23 cw(c2129.92,1167.32) 2135.83,1167.32 2135.83,1157.48 ccw(c2141.73,1157.48) 2141.73,1151.57 ccw(c2141.73,1157.48) 2147.64,1157.48 2147.64,1167.32 cw(c2153.54,1167.32) 2153.54,1173.23 2157.48,1173.23 ccw(c2157.48,1175.2) 2159.45,1175.2 cw(c2161.42,1175.2) 2161.42,1177.16 2169.29,1177.17 cw(c2169.29,1175.2) 2171.26,1175.2 ccw(c2173.23,1175.2) 2173.23,1173.23 2181.1,1173.23 ccw(c2181.1,1175.2) 2183.07,1175.2 cw(c2185.04,1175.2) 2185.04,1177.16 2192.91,1177.17 cw(c2192.91,1175.2) 2194.88,1175.2 ccw(c2196.85,1175.2) 2196.85,1173.23 2602.22,1173.23 cw(c2602.22,1163.39) 2609.18,1170.35 2644.75,1134.77 ccw(c2651.71,1141.73) 2651.71,1131.89 v1(2856.3,1131.89)
JTAG_TMS: R37.2 U4.T13 | length 1084.8
  L1 (TOP) w3.54: U4.T13@1913.39,992.13 v1(1929.13,1007.87) ; v1(2856.3,1015.75) 2872.05,1015.75 R37.2@2885.83,1015.75
  L4 (BOTTOM) w3.54: v1(1929.13,1007.87) 1929.13,1003.94 cw(c1919.63,1003.94) 1926.35,997.22 1920.21,991.07 ccw(c1927.16,984.11) 1917.32,984.11 1917.32,952.9 ccw(c1927.16,952.9) 1920.21,945.94 1920.35,945.8 ccw(c1927.3,952.76) 1927.3,942.91 1974.27,942.91 ccw(c1974.27,952.76) 1981.23,945.8 2048.3,1012.87 cw(c2055.26,1005.91) 2055.26,1015.75 v1(2856.3,1015.75)
JTAGSEL: R10.1 R11.2 U4.B4 | length 302.5
  L1 (TOP) w3.54: R10.1@1295.28,539.37 1312.99,539.37 1330.71,539.37 1346.46,539.37 1346.46,549.07 cw(c1356.3,549.07) 1349.34,556.03 1377.04,583.73 ccw(c1370.08,590.69) 1379.92,590.69 v1(1379.92,608.27) ; v1(1456.69,724.41) U4.B4@1472.44,708.66
  L3 (PWR) w3.54: v1(1379.92,608.27) 1392.79,621.13 ccw(c1385.83,628.09) 1395.67,628.09 1395.67,659.31 cw(c1405.51,659.31) 1398.55,666.27 v1(1456.69,724.41)
LED_0: R60.2 U4.J2 | length 495.7
  L1 (TOP) w3.54: R60.2@1354.33,318.9 1640.92,605.48 ccw(c1634.2,612.2) 1643.7,612.2 cw(c1653.2,612.2) 1646.48,618.93 1652.73,625.17 cw(c1659.45,618.45) 1659.45,627.95 ccw(c1659.45,637.46) 1666.17,630.74 1676.35,640.92 cw(c1683.07,634.2) 1683.07,643.7
  L1 (TOP) w7.87: R60.2@1338.58,307.09 R60.2@1354.33,318.9 ; 1683.07,643.7 1685.41,643.7 ccw(c1685.41,653.54) 1688.52,644.21 U4.J2@1692.91,645.67
LED_1: R61.2 U4.K2 | length 508.4
  L1 (TOP) w3.54: 1418.38,327.83 cw(c1425.34,320.87) 1425.34,330.71 1456.55,330.71 ccw(c1456.55,340.55) 1463.51,333.59 1737.27,607.35 ccw(c1730.31,614.31) 1740.16,614.31
  L1 (TOP) w7.87: R61.2@1397.64,307.09 1411.42,320.87 1418.38,327.83 ; U4.K2@1724.41,645.67 1737.27,632.8 cw(c1730.31,625.84) 1740.16,625.84 1740.16,614.31
LED_2: R62.2 U4.N1 | length 488
  L1 (TOP) w3.54: R62.2@1470.47,320.87 1640.82,491.21 cw(c1647.78,484.25) 1647.78,494.09 1690.8,494.09 ccw(c1690.8,503.94) 1697.76,496.98
  L1 (TOP) w7.87: R62.2@1456.69,307.09 R62.2@1470.47,320.87 ; 1697.76,496.98 1811.35,610.56 cw(c1818.31,603.6) 1815.2,612.94 U4.N1@1818.9,614.17
LED_3: R63.2 U4.N2 | length 476.3
  L1 (TOP) w7.87: R63.2@1515.75,307.09 1525.59,320.87 v1(1631.89,427.17) ; U4.N2@1818.9,645.67 v1(1834.65,629.92)
  L4 (BOTTOM) w7.87: v1(1631.89,427.17) v1(1834.65,629.92)
LED_4: R64.2 U4.N3 | length 483.4
  L1 (TOP) w3.54: R64.2@1574.8,316.79 cw(c1584.65,316.79) 1577.69,323.75 1646.72,392.79 ccw(c1639.76,399.75) 1649.61,399.75 v1(1649.61,476.38)
  L1 (TOP) w7.87: R64.2@1574.8,307.09 R64.2@1574.8,316.79 ; U4.N3@1818.9,677.17 v1(1834.65,661.42)
  L4 (BOTTOM) w7.87: v1(1649.61,476.38) v1(1834.65,661.42)
LED_5: R65.2 U4.P1 | length 404.8
  L1 (TOP) w3.54: 1647.64,324.94 1647.64,375.84 cw(c1657.48,375.84) 1650.52,382.8 1859.18,591.47 ccw(c1852.22,598.42) 1859.18,605.38
  L1 (TOP) w7.87: R65.2@1633.86,307.09 1644.75,317.98 ccw(c1637.79,324.94) 1647.64,324.94 ; U4.P1@1850.39,614.17 1859.18,605.38
LED_6: R66.2 U4.P2 | length 450.2
  L1 (TOP) w3.54: 1881.75,629.92 cw(c1881.75,620.08) 1888.71,627.04 1892.79,622.96 cw(c1885.83,616) 1895.67,616 1895.67,517.86 cw(c1885.83,517.86) 1892.79,510.9
  L1 (TOP) w7.87: R66.2@1692.91,307.09 1702.76,320.87 1892.79,510.9 ; U4.P2@1850.39,645.67 1863.26,632.8 ccw(c1870.22,639.76) 1870.22,629.92 1881.75,629.92
LED_7: R67.2 U4.P3 | length 486.3
  L1 (TOP) w3.54: 1881.75,661.42 cw(c1881.75,651.57) 1888.71,658.53 1896.82,650.42 cw(c1890.1,643.7) 1899.61,643.7 ccw(c1909.11,643.7) 1902.39,636.98 1908.63,630.74 ccw(c1915.35,637.46) 1915.35,627.95 cw(c1915.35,618.45) 1922.07,625.17 1924.28,622.96 cw(c1917.32,616) 1927.16,616 1927.16,490.3 cw(c1917.32,490.3) 1924.28,483.34
  L1 (TOP) w7.87: R67.2@1751.97,307.09 1761.81,320.87 1924.28,483.34 ; U4.P3@1850.39,677.17 1863.26,664.3 ccw(c1870.22,671.26) 1870.22,661.42 1881.75,661.42
NetC12_2: C12.2 U2.6 | length 82.2
  L1 (TOP) w7.87: U2.6@587.09,226.97 C12.2@669.29,228.35
NetC15_2: C15.2 U3.6 | length 82.2
  L1 (TOP) w7.87: C15.2@2429.13,1429.13 U3.6@2511.34,1430.51
NetC37_2: C37.2 R16.1 X1.1 | length 870.6
  L1 (TOP) w7.87: R16.1@2106.3,1082.68 2113.23,1089.43 2276.62,1089.43 v1(2286.46,1099.27) 2473.47,1099.27 2487.25,1085.49 2487.25,981.16 2473.47,967.38 v1(2412.44,967.38) ; C37.2@2228.35,976.38 2231.34,977.22 v1(2347.48,977.22) ; X1.1@2236.22,1041.34 2239.22,1042.18 2280.56,1042.18 2286.46,1048.09 v1(2286.46,1055.96)
  L4 (BOTTOM) w7.87: v1(2286.46,1055.96) v1(2286.46,1099.27) ; v1(2347.48,977.22) 2357.33,967.38 v1(2412.44,967.38)
NetD3_2: D3.2 R60.1 | length 173.6
  L1 (TOP) w7.87: D3.2@1338.58,149.41 1337.64,150.45 1300.24,150.45 1298.27,152.42 1298.27,242.97 1300.24,244.94 1337.64,244.94 R60.1@1338.58,244.09
NetD4_2: D4.2 R61.1 | length 94.7
  L1 (TOP) w7.87: D4.2@1397.64,149.41 R61.1@1397.64,244.09
NetD5_2: D5.2 R62.1 | length 94.7
  L1 (TOP) w7.87: D5.2@1456.69,149.41 R62.1@1456.69,244.09
NetD6_2: D6.2 R63.1 | length 94.7
  L1 (TOP) w7.87: D6.2@1515.75,149.41 R63.1@1515.75,244.09
NetD7_2: D7.2 R64.1 | length 94.7
  L1 (TOP) w7.87: D7.2@1574.8,149.41 R64.1@1574.8,244.09
NetD8_2: D8.2 R65.1 | length 94.7
  L1 (TOP) w7.87: D8.2@1633.86,149.41 R65.1@1633.86,244.09
NetD9_2: D9.2 R66.1 | length 94.7
  L1 (TOP) w7.87: D9.2@1692.91,149.41 R66.1@1692.91,244.09
NetD10_2: D10.2 R67.1 | length 173.3
  L1 (TOP) w7.87: D10.2@1751.97,149.41 1754.96,150.45 1790.4,150.45 1792.37,152.42 1792.37,242.97 1790.4,244.94 1754.96,244.94 R67.1@1751.97,244.09
NetF1_1: F1.1 J1.1 | length 175.1
  L1 (TOP) w7.87: J1.1@2807.09,1902.56 2810.08,1904.39 2900.63,1904.39 2926.22,1878.8 2926.22,1837.46 F1.1@2925.2,1834.06
NetF2_1: F2.1 J3.1 | length 173.8
  L1 (TOP) w19.68: J3.1@2019.69,1902.56 2022.68,1902.42 2026.62,1898.48 2119.14,1898.48 2138.82,1878.8 2138.82,1837.46 F2.1@2137.8,1834.06
NetJ2_1: J2.1 R31.1 | length 103
  L1 (TOP) w19.68: J2.1@3261.42,862.8 R31.1@3263.78,759.84
NetJ4_1: J4.1 R44.1 | length 116
  L1 (TOP) w19.68: R44.1@1925.2,106.3 1928.19,107.14 1965.59,107.14 1975.44,97.3 2036.46,97.3 J4.1@2036.81,96.85
NetL1_1: L1.1 U1.3 | length 141.8
  L1 (TOP) w35.43: U1.3@498.03,1740.16 U1.3@501.03,1741
  L1 (TOP) w37.8: U1.3@501.03,1741 U1.3@503,1741
  L1 (TOP) w40.16: U1.3@503,1741 U1.3@504.96,1741
  L1 (TOP) w42.52: U1.3@504.96,1741 U1.3@506.93,1741
  L1 (TOP) w44.88: U1.3@506.93,1741 U1.3@508.9,1741
  L1 (TOP) w47.24: U1.3@508.9,1741 530.56,1741 534.49,1737.06 636.85,1737.06 L1.1@637.8,1736.22
NetR1_1: R1.1 R4.2 U2.7 | length 129.7
  L1 (TOP) w7.87: U2.7@587.09,276.97 669.29,279.53 R1.1@673.23,326.77
NetR3_2: R3.2 R5.2 U1.5 | length 147.6
  L1 (TOP) w7.87: R3.2@326.77,1791.34 326.77,1842.52 U1.5@423.23,1842.52
NetR6_1: R6.1 R8.2 U3.7 | length 129.7
  L1 (TOP) w7.87: R6.1@2425.2,1330.71 2429.13,1377.95 U3.7@2511.34,1380.51
NRST: R12.2 U4.R13 | length 578.9
  L1 (TOP) w3.54: U4.R13@1881.89,992.13 v2(1897.64,1007.87) ; v1(1996.06,990.16) 2112.06,990.16 cw(c2112.06,980.31) 2119.02,987.27 2251.05,855.24 ccw(c2258.01,862.2) 2258.01,852.36 2367.97,852.36 cw(c2367.97,842.52) 2374.93,849.48 R12.2@2385.83,838.58
  L3 (PWR) w3.54: v2(1897.64,1007.87) 1912.47,993.04 ccw(c1919.43,1000) 1919.43,990.16 v1(1996.06,990.16)
NTRST: R41.2 U4.T15 | length 1109.5
  L1 (TOP) w3.54: v1(1899.61,1070.87) 1900.59,1070.87 cw(c1900.59,1068.49) 1902.27,1070.17 1909.77,1062.67 cw(c1902.81,1055.71) 1912.15,1058.82 1913.39,1055.12 v2(1929.13,1070.87) ; v1(2856.3,1263.78) 2872.05,1263.78 R41.2@2885.83,1263.78
  L4 (BOTTOM) w3.54: v1(1899.61,1070.87) 2003.8,1070.87 ccw(c2003.8,1080.71) 2010.76,1073.75 2197.9,1260.9 cw(c2204.86,1253.94) 2204.86,1263.78 v1(2856.3,1263.78)
SD_CD: R59.2 U4.R4 | length 1020.7
  L1 (TOP) w3.54: 2042.25,695.8 2066.01,719.56 cw(c2072.97,712.6) 2072.97,722.44 2828.6,722.44
  L1 (TOP) w7.87: U4.R4@1881.89,708.66 1894.75,695.8 ccw(c1901.71,702.76) 1901.71,692.91 2035.29,692.91 ccw(c2035.29,702.76) 2042.25,695.8 ; 2828.6,722.44 cw(c2828.6,712.6) 2835.56,719.56 2856.3,698.82 R59.2@2870.08,685.04
SD_CLK: R56.2 U4.U8 | length 818.5
  L1 (TOP) w3.54: U4.U8@1944.88,834.65 v1(1960.63,818.9) ; v1(2074.8,704.72) 2499.86,704.72 cw(c2499.86,694.88) 2506.82,701.84 2635.83,572.83 R56.2@2649.61,559.06
  L4 (BOTTOM) w3.54: v1(1960.63,818.9) v1(2074.8,704.72)
SD_CMD: R55.2 U4.R7 | length 1077.4
  L1 (TOP) w3.54: U4.R7@1881.89,803.15 v1(1897.64,787.4) ; v1(2620.08,218.5) 2633.81,218.5 cw(c2633.81,208.66) 2637.68,217.71 R55.2@2649.61,212.6
  L4 (BOTTOM) w3.54: v1(1897.64,787.4) 1907.48,777.56 ccw(c1909.45,779.53) 1911.42,777.56 cw(c1913.39,775.59) 1915.35,777.56 1923.23,769.68 cw(c1921.26,767.72) 1923.23,765.75 ccw(c1925.2,763.78) 1923.23,761.81 1927.16,757.87 cw(c1921.26,751.97) 1927.16,746.06 1919.29,738.19 ccw(c1925.2,732.28) 1919.29,726.38 ccw(c1925.2,732.28) 1931.1,726.38 1938.98,734.25 cw(c1944.88,728.35) 1950.79,734.25 1952.76,732.28 ccw(c1956.69,736.22) 1960.63,732.28 cw(c1964.57,728.35) 1968.5,732.28 1972.44,728.35 cw(c1968.5,724.41) 1972.44,720.47 ccw(c1976.38,716.54) 1972.44,712.6 1978.35,706.69 ccw(c1980.31,708.66) 1982.28,706.69 cw(c1984.25,704.72) 1986.22,706.69 1994.09,698.82 cw(c1992.13,696.85) 1994.09,694.88 ccw(c1996.06,692.91) 1994.09,690.94 2463.65,221.39 ccw(c2470.61,228.35) 2470.61,218.5 v1(2620.08,218.5)
SD_DAT0: R57.2 U4.T7 | length 1097.8
  L1 (TOP) w3.54: U4.T7@1913.39,803.15 v1(1929.13,787.4) ; v1(2622.05,133.86) 2625.98,133.86 cw(c2625.98,124.35) 2632.7,131.07 2635.83,127.95 R57.2@2649.6,110.24
  L4 (BOTTOM) w3.54: v1(1929.13,787.4) 2442,274.54 ccw(c2448.96,281.5) 2448.96,271.65 2586.47,271.65 cw(c2586.47,261.81) 2593.43,268.77 2634.91,227.29 cw(c2627.95,220.33) 2637.79,220.33 2637.79,153.68 cw(c2627.95,153.68) 2634.91,146.72 v1(2622.05,133.86)
SD_DAT1: R58.2 U4.P8 | length 1084
  L1 (TOP) w3.54: U4.P8@1850.39,834.65 v1(1866.14,818.9) ; v1(2620.08,643.7) 2631.75,643.7 cw(c2631.75,633.86) 2638.71,640.82 R58.2@2649.61,629.92
  L4 (BOTTOM) w3.54: v1(1866.14,818.9) 1870.08,818.9 ccw(c1870.08,828.4) 1876.8,821.68 1894.75,839.64 cw(c1901.71,832.68) 1901.71,842.52 1913.96,842.52 ccw(c1913.96,845.88) 1916.34,843.5 1916.63,843.79 cw(c1918.31,842.11) 1918.31,844.49 ccw(c1918.31,846.86) 1919.99,845.18 1920.27,845.47 cw(c1922.65,843.1) 1922.65,846.46 1927.16,846.46 ccw(c1927.16,852.36) 1933.07,852.36 1933.07,860.24 cw(c1938.98,860.24) 1938.98,866.14 cw(c1938.98,860.24) 1944.88,860.24 1944.88,852.36 ccw(c1950.79,852.36) 1950.79,846.46 ccw(c1950.79,852.36) 1956.69,852.36 1956.69,887.79 cw(c1962.6,887.79) 1962.6,893.7 cw(c1962.6,887.79) 1968.5,887.8 1968.5,852.36 ccw(c1974.41,852.36) 1974.41,846.46 ccw(c1974.41,852.36) 1980.31,852.36 1980.31,874.02 cw(c1986.22,874.02) 1986.22,879.92 cw(c1986.22,874.02) 1992.13,874.02 1992.13,852.36 ccw(c1998.03,852.36) 1998.03,846.46 2001.97,846.46 ccw(c2001.97,848.42) 2003.94,848.42 cw(c2005.9,848.42) 2005.9,850.39 2013.78,850.39 cw(c2013.78,848.42) 2015.75,848.42 ccw(c2017.72,848.42) 2017.72,846.46 2025.59,846.46 ccw(c2025.59,848.42) 2027.56,848.42 cw(c2029.53,848.42) 2029.53,850.39 2037.4,850.39 cw(c2037.4,848.42) 2039.37,848.42 ccw(c2041.34,848.42) 2041.34,846.46 2413.25,846.46 cw(c2413.25,836.61) 2420.21,843.57 v1(2620.08,643.7)
SD_DAT2: R53.2 U4.T8 | length 1083
  L1 (TOP) w3.54: U4.T8@1913.39,834.65 1914.62,838.35 cw(c1923.96,835.23) 1917,842.19 1928.22,853.42 ccw(c1921.26,860.38) 1931.1,860.38 v1(1931.1,881.89) ; v1(2637.79,521.65) 2637.79,508.89 ccw(c2647.64,508.89) 2639.45,503.43 R53.2@2649.61,488.19
  L4 (BOTTOM) w3.54: v1(1931.1,881.89) 1975.46,926.25 cw(c1982.42,919.29) 1982.42,929.13 1984.25,929.13 ccw(c1984.25,935.04) 1990.16,935.04 cw(c1996.06,935.04) 1996.06,940.94 cw(c1996.06,935.04) 2001.97,935.04 ccw(c2007.87,935.04) 2007.87,929.13 2010.83,929.13 ccw(c2010.83,932.09) 2013.78,932.09 cw(c2016.73,932.09) 2016.73,935.04 2022.64,935.04 cw(c2022.64,932.09) 2025.59,932.09 ccw(c2028.54,932.09) 2028.54,929.13 2035.43,929.13 ccw(c2035.43,931.1) 2037.4,931.1 cw(c2039.37,931.1) 2039.37,933.07 2047.24,933.07 cw(c2047.24,931.1) 2049.21,931.1 ccw(c2051.18,931.1) 2051.18,929.13 2232.14,929.13 cw(c2232.14,919.29) 2239.1,926.25 2306.17,859.18 ccw(c2313.13,866.14) 2313.13,856.3 2427.02,856.3 cw(c2427.02,846.46) 2433.98,853.42 2634.91,652.49 cw(c2627.95,645.53) 2637.79,645.53 v1(2637.79,521.65)